# Altium PCB PCB_BOB.PcbDoc (part 2 of 2)
Units mil, origin at the board's own origin, x right, y up, seen from the top; angles counter-clockwise.
Board outline 2103 x 1454 mil, 2 copper layers (Top Layer, Bottom Layer), stack 62 mil thick; 57 components, 42 nets, 189 pads, 71 vias.
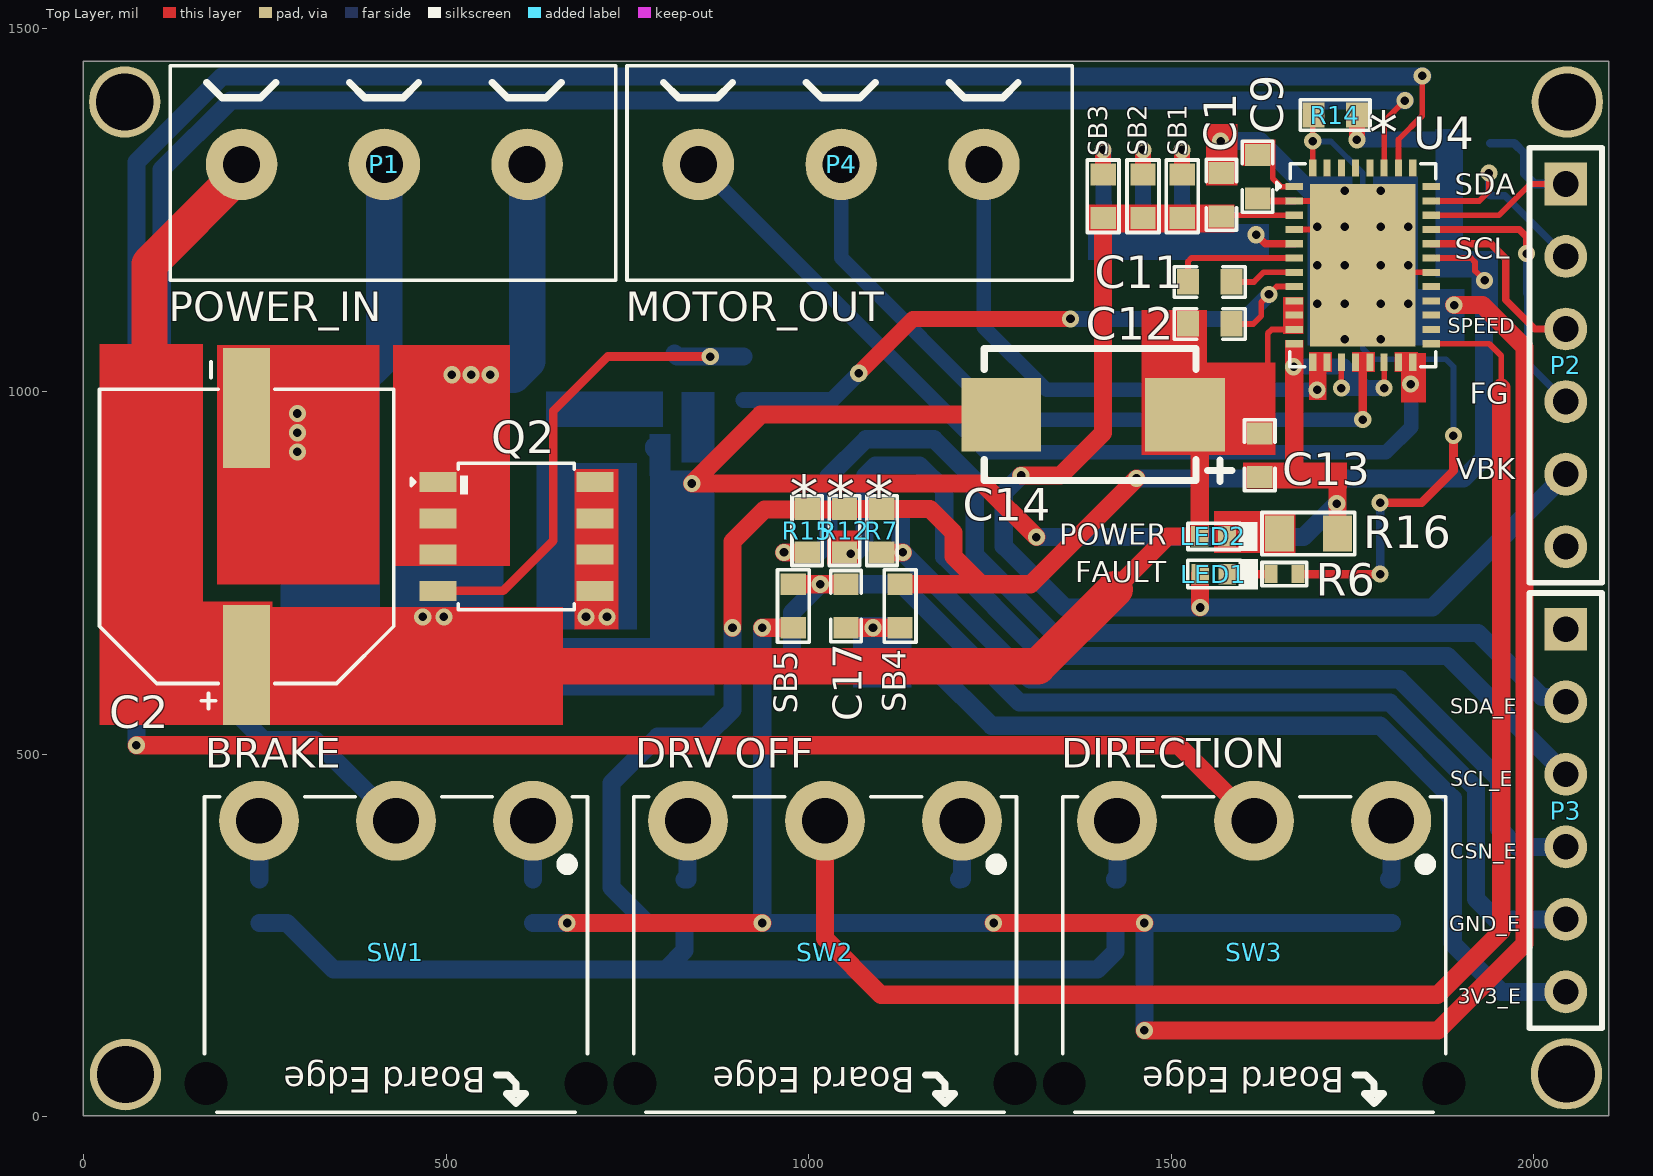
[diagram p0: Top Layer view]

## Via types
v1: diameter 23.62, hole 11.81, Top Layer to Bottom Layer, 52 vias
v2: diameter 19.68, hole 11.81, Top Layer to Bottom Layer, 16 vias
v3: diameter 23.62, hole 11.81, Top Layer to Bottom Layer, tented both sides, 3 vias

## Nets (pads, with @x,y where several pads share a name; then routed paths per layer and width w, separated by ;. In a path a pad name is that pad's centre, name@x,y a point inside that pad or via, vN(x,y) a via of type N, cw(c..) or ccw(c..) an arc to the next point about the centre after c; other vN are vias at no path point) (continued)
SCL_ENC: (continued)
  Top Layer w25: R12.1 1051.5,776 v1(1058,776)
  Bottom Layer w25: v1(1058,776) 1062.36,776 1077,790.64 U1.7 1077.84,836.1 1077.84,883.36 1092.48,898 1153,898 1187,864 1187,772.01 1324.01,635 1881,635 P3.3
SDA: P2.1 R18.1 U4.30 | length 353
  Top Layer w8: U4.30 1951.9,1242.9 1995,1286 P2.1@2047,1286
  Bottom Layer w12: R18.1 1973,1342 1987,1328 1987,1300 2001,1286 P2.1@2047,1286
SDA_ENC: P3.2 R15.1 U1.6 | length 1437.7
  Top Layer w25: v1(966,778) R15.1
  Bottom Layer w25: v1(966,778) 1013.36,778 1027,791.64 U1.6 1027,882 1079,934 1173,934 1229,878 1229,775.26 1337.26,667 1923,667 2011.48,578.52 2037.48,578.52 P3.2
SPEED: P2.3 U4.28 | length 267.6
  Top Layer w10: U4.28 1940.47,1203.53 1961,1183 1961,1126 2001,1086 P2.3
SW_BUCK: L1.1 L2.1 R1.2 U4.5 | length 57.7
  Top Layer w10: v1(1617,1216) 1617.2,1216 1629.67,1203.53 U4.5
VBK: C1.2 LED1.1 P2.5 SB1.2 SB2.2 SB3.2 U4.3 | length 1683.4
  Top Layer w8: SB2.2 1464.9,1242.9 1569,1242.9 U4.3
  Top Layer w25: v1(1293,884) 1347.36,884 1406,942.64 SB3.2 ; v1@1539.8,702 LED1.1
  Bottom Layer w25: v1(1293,884) 1269,860 1269,786.5 1353.5,702 v1(1540,702) 1860,702 P2.5
VM: C2.1 C4.2 C6.2 C8.1 C12.1 C13.1 C14.1 C16.2 L3.2 LED2.1 P1.3 U4.9 U4.10 U4.11 | length 1932.6
  Top Layer w8: 1633,1028 1633,1080 1638.42,1085.42 U4.11
  Top Layer w25: 1422,727 1495,800 LED2.1 1539.3,976.3 C14.1@1544.84,981.84
  Top Layer w50: 74,977 91,994 91,1175.75 218.15,1302.9 P1.3@218.15,1316 ; 354.43,621 1316,621 1422,727
  other v1: 468,689 497,689
VM_IN: D1.1 P1.1 Q2.1 Q2.2 Q2.3 | length 434.4
  Bottom Layer w50: D1.1@521.5,983.5 545.63,1007.63 ; D1.1 D1.1@530.26,992.26 ; v1(534.5,1023) 593.08,1023 611.85,1041.77 P1.1@611.85,1316 ; 548.35,1011.35 v1@558,1021
  other v1: 508,1023 561,1023
pads on no net: P2.6 P3.1 SW1.MH1 SW1.MH2 SW2.MH1 SW2.MH2 SW3.MH1 SW3.MH2 U1.3 U1.5 U4.22 U4.23 U4.24 U4.25 U4.32 U4.33 U4.36 U4.37 U4.38 U4.39

## Other copper
Top Layer:
  rectangle net NetLED2_2: 1559,777 1671,835
  rectangle net VM: 1459,1036 1549,1112
  rectangle net SCL_ENC: 1025.5,761 1070.5,808
  rectangle net VM: 1653.96,1079 1682,1130
  rectangle net OUT_A: 1689.89,988 1714,1040.14
  rectangle net OUT_A: 1689.89,1027 1721.89,1054
  rectangle net OUT_B: 1748.94,1027 1780.94,1054
  rectangle net OUT_C: 1817,985 1851.5,1053
  rectangle net OUT_C: 1808,1027 1840,1054
  rectangle net VBK: 1386,1219 1587,1258
  rectangle net AGND: 1548,1284 1591,1369
  rectangle net PGND: 1599,866 1742,902
  rectangle net PGND: 1657,866 1682,1071
  rectangle net VM: 1459,912 1644,1040
  rectangle net DVDD: 1599,1311 1644,1347
  rectangle net VM: 22,540 261,710
  rectangle net VM_IN: 427,759 588,1064
  region net VM: 165,544 165,1065 22,1065 22,544
  rectangle net VM: 48,540 661,703
  rectangle net PGND: 184,734 408,1064
  rectangle net NetC3_2: 676.86,672 738,893
Bottom Layer:
  rectangle net 3V3_ENC: 1061,592 1142,689
  region net AGND: 1750,1296 1688,1296 1688,1063 1750,1063
  rectangle net AGND: 1778,1063 1840,1296
  rectangle net AGND: 1811,1063 1904,1141
  rectangle net AVDD: 1882,1157 1950.74,1193.26
  rectangle net AVDD: 1914,1115 1950.74,1193.26
  rectangle net AVDD: 1864,1157 1902,1362
  rectangle net SW_BUCK: 1385,1181 1635,1231
  region net PGND: 809.5,883.44 809.5,941.44 780.5,941.44 780.5,883.44
  rectangle net NetQ1_1: 825,902 870,999
  rectangle net VM_IN: 460,921 583,1046
  region net PGND: 272,660 272,581 870,581 870,660
  region net PGND: 409,1045 272,1045 272,588 409,588
  region net NetC3_2: 763,901 625,901 625,672 763,672
  rectangle net VM: 427,673 579,902
  rectangle net NetD1_2: 638,951 799,1000
  rectangle net PGND: 781,649 870,891

## Silkscreen, mask and mechanical layers (free items; w line width, h text height)
Top Overlay:
  text "*" at 1813,1430.55 h100 r180
  text "SDA" at 1891.12,1261.41 h50
  text "SCL" at 1891.12,1173.41 h50
  text "POWER_IN" at 118,1082.96 h70
  text "MOTOR_OUT" at 748,1082.96 h70
  text "SPEED" at 1881.31,1073.41 h35
  text "FG" at 1911.5,973.41 h50
  text "*" at 1014,928.55 h100 r180
  text "*" at 1064,927.55 h100 r180
  text "*" at 1117,927.55 h100 r180
  text "VBK" at 1892.81,869.41 h50
  text "POWER" at 1345.21,778.77 h50
  text "FAULT" at 1367.77,727.04 h50
  text "SDA_E" at 1884.32,548.52 h35
  text "BRAKE" at 167.81,466.99 h70
  text "DRV OFF" at 760.91,466.99 h70
  text "DIRECTION" at 1348,466.99 h70
  text "SCL_E" at 1884.6,448.52 h35
  text "CSN_E" at 1884.52,348.52 h35
  text "GND_E" at 1883.03,248.52 h35
  text "3V3_E" at 1894.79,148.52 h35
Bottom Overlay:
  drawing of 3054 lines, arcs and shapes, not listed
  text "*" at 1969,1389.55 h100 r180
  text "*" at 1966,1317.55 h100 r180
  text "*" at 1916,1228.55 h100 r180
  text "#" at 939,1009.41 h55 r180
  text "#" at 873,942.41 h55 r180
  text "ZERO CARBON FOOTPRINT" at 1985,481 h45
  text "#" at 575,288.41 h55 r180
  text "#" at 1372,288.41 h55 r180
  text "#" at 1749,288.41 h55 r180
  text "#" at 198,287.41 h55 r180
  text "#" at 784,287.41 h55 r180
  text "#" at 1163,287.41 h55 r180
  text "Note:" at 1741,143 h75
  text "*>> 5.1K" at 1746,74.76 h75
  text "#>> 10K" at 1746,12.11 h75
Board Outline:
  the board outline again, w10
Fabrication:
  drawing of 322 lines, arcs and shapes, not listed
  text "Layer" at 72.74,5741.64 h60
  text "Name" at 482.65,5741.64 h60
  text "Material" at 1412.39,5741.64 h60
  text "Thickness" at 2272.16,5741.64 h60
  text "Constant" at 2922,5741.64 h60
  text "Board Layer Stack" at 3491.86,5741.64 h60
  text "Top Overlay" at 482.65,5621.64 h60
  text "Top Solder" at 482.65,5501.64 h60
  text "Solder Resist" at 1412.39,5501.64 h60
  text "0.50mil" at 2272.16,5501.64 h60
  text "3.5" at 2922,5501.64 h60
  text "1" at 72.74,5381.64 h60
  text "Top Layer" at 482.65,5381.64 h60
  text "12.50mil" at 2272.16,5381.64 h60
  text "Dielectric 1" at 482.65,5261.64 h60
  text "FR-4" at 1412.39,5261.64 h60
  text "37.00mil" at 2272.16,5261.64 h60
  text "4.8" at 2922,5261.64 h60
  text "2" at 72.74,5141.64 h60
  text "Bottom Layer" at 482.65,5141.64 h60
  text "12.50mil" at 2272.16,5141.64 h60
  text "Bottom Solder" at 482.65,5021.64 h60
  text "Solder Resist" at 1412.39,5021.64 h60
  text "0.50mil" at 2272.16,5021.64 h60
  text "3.5" at 2922,5021.64 h60
  text "Bottom Overlay" at 482.65,4901.64 h60
Drill Drawing:
  circle w10: c2550.62,1278.83 r33.33
  lines w10: 2517.29,495.5 2517.29,512.17 2533.96,528.83 2517.29,545.5 2517.29,562.17 2533.96,562.17 2550.62,545.5 2567.29,562.17 2583.96,562.17 2583.96,545.5 2567.29,528.83 2583.96,512.17 2583.96,495.5 2567.29,495.5 2550.62,512.17 2533.96,495.5 2517.29,495.5 ; 2517.29,645.5 2583.96,645.5 2583.96,712.17 2517.29,712.17 2517.29,645.5 ; 2517.29,812.17 2533.96,812.17 2550.62,795.5 2567.29,812.17 2583.96,812.17 2567.29,828.83 2583.96,845.5 2567.29,845.5 2550.62,862.17 2533.96,845.5 2517.29,845.5 2533.96,828.83 2517.29,812.17 ; 2517.29,1012.17 2583.96,1012.17 2550.62,945.5 2517.29,1012.17 ; 2517.29,1112.17 2533.96,1112.17 2533.96,1095.5 2567.29,1095.5 2567.29,1112.17 2583.96,1112.17 2583.96,1145.5 2567.29,1145.5 2567.29,1162.17 2533.96,1162.17 2533.96,1145.5 2517.29,1145.5 2517.29,1112.17
  lines w15: 2457.5,450.5 15211.94,450.5 ; 2457.5,1350.5 15211.94,1350.5 ; 3008.38,300.5 3008.38,1500.5 ; 3598.22,300.5 3598.22,1500.5 ; 4697.9,300.5 4697.9,1500.5 ; 5203.78,300.5 5203.78,1500.5 ; 5937.58,300.5 5937.58,1500.5 ; 7437.13,300.5 7437.13,1500.5 ; 8026.98,300.5 8026.98,1500.5 ; 8772.78,300.5 8772.78,1500.5 ; 9422.6,300.5 9422.6,1500.5 ; 10276.37,300.5 10276.37,1500.5 ; 11609.98,300.5 11609.98,1500.5 ; 12943.58,300.5 12943.58,1500.5 ; 13809.34,300.5 13809.34,1500.5 ; 2457.5,300.5 15211.94,300.5 15211.94,1500.5 2457.5,1500.5 2457.5,300.5
  text "Symbol" at 2547.5,1395.5 h72
  text "Count" at 3053.38,1395.5 h72
  text "Hole Size" at 3643.22,1395.5 h72
  text "Plated" at 4742.9,1395.5 h72
  text "Hole Type" at 5248.78,1395.5 h72
  text "Drill Layer Pair" at 5982.58,1395.5 h72
  text "Via/Pad" at 7482.13,1395.5 h72
  text "Pad Shape" at 8071.98,1395.5 h72
  text "Template" at 8817.78,1395.5 h72
  text "Description" at 9467.6,1395.5 h72
  text "Hole Tolerance (+)" at 10321.37,1395.5 h72
  text "Hole Tolerance (-)" at 11654.98,1395.5 h72
  text "Hole Length" at 12988.58,1395.5 h72
  text "Routed Path Length" at 13854.34,1395.5 h72
  text "4" at 3053.38,1245.5 h60
  text "2.000mm (78.74mil)" at 3643.22,1245.5 h60
  text "PTH" at 4742.9,1245.5 h60
  text "Round" at 5248.78,1245.5 h60
  text "Top Layer - Bottom Layer" at 5982.58,1245.5 h60
  text "Pad" at 7482.13,1245.5 h60
  text "Rounded" at 8071.98,1245.5 h60
  text "c250h200" at 8817.78,1245.5 h60
  text "-" at 12988.58,1245.5 h60
  text "-" at 13854.34,1245.5 h60
  text "6" at 3053.38,1095.5 h60
  text "1.300mm (51.18mil)" at 3643.22,1095.5 h60
  text "PTH" at 4742.9,1095.5 h60
  text "Round" at 5248.78,1095.5 h60
  text "Top Layer - Bottom Layer" at 5982.58,1095.5 h60
  text "Pad" at 7482.13,1095.5 h60
  text "Rounded" at 8071.98,1095.5 h60
  text "c250h130" at 8817.78,1095.5 h60
  text "-" at 12988.58,1095.5 h60
  text "-" at 13854.34,1095.5 h60
  text "6" at 3053.38,945.5 h60
  text "1.500mm (59.06mil)" at 3643.22,945.5 h60
  text "NPTH" at 4742.9,945.5 h60
  text "Round" at 5248.78,945.5 h60
  text "Top Layer - Bottom Layer" at 5982.58,945.5 h60
  text "Pad" at 7482.13,945.5 h60
  text "Rounded" at 8071.98,945.5 h60
  text "c0hn150" at 8817.78,945.5 h60
  text "-" at 12988.58,945.5 h60
  text "-" at 13854.34,945.5 h60
  text "9" at 3053.38,795.5 h60
  text "1.600mm (62.99mil)" at 3643.22,795.5 h60
  text "PTH" at 4742.9,795.5 h60
  text "Round" at 5248.78,795.5 h60
  text "Top Layer - Bottom Layer" at 5982.58,795.5 h60
  text "Pad" at 7482.13,795.5 h60
  text "Rounded" at 8071.98,795.5 h60
  text "c280h160" at 8817.78,795.5 h60
  text "-" at 12988.58,795.5 h60
  text "-" at 13854.34,795.5 h60
  text "12" at 3053.38,645.5 h60
  text "0.900mm (35.43mil)" at 3643.22,645.5 h60
  text "PTH" at 4742.9,645.5 h60
  text "Round" at 5248.78,645.5 h60
  text "Top Layer - Bottom Layer" at 5982.58,645.5 h60
  text "Pad" at 7482.13,645.5 h60
  text "(Mixed)" at 8071.98,645.5 h60
  text "(Mixed)" at 8817.78,645.5 h60
  text "-" at 12988.58,645.5 h60
  text "-" at 13854.34,645.5 h60
  text "71" at 3053.38,495.5 h60
  text "0.300mm (11.81mil)" at 3643.22,495.5 h60
  text "PTH" at 4742.9,495.5 h60
  text "Round" at 5248.78,495.5 h60
  text "Top Layer - Bottom Layer" at 5982.58,495.5 h60
  text "Via" at 7482.13,495.5 h60
  text "Rounded" at 8071.98,495.5 h60
  text "(Mixed)" at 8817.78,495.5 h60
  text "-" at 12988.58,495.5 h60
  text "-" at 13854.34,495.5 h60
  text "108 Total" at 3053.38,345.5 h60

## Dimensions
0,1455 to 0,1 on Draft and Dimensions
0,1455 to 2103,1455 on Draft and Dimensions

## Text inside footprints (layer, text, board x,y; h text height)
SW1: Top Overlay "Board Edge" at 555,68.23 h35 r180
SW2: Top Overlay "Board Edge" at 1146.59,68.23 h35 r180
SW3: Top Overlay "Board Edge" at 1738.19,68.23 h35 r180